# Altium PCB Studio_Clock_hv1.01_PCB_240215a.PcbDoc (part 4 of 5)
Units mm, origin at the board's own origin, x right, y up, seen from the top; angles counter-clockwise.
Board outline 360 x 60 mm, 4 copper layers (TOP, PWR, GND, BOTTOM), stack 0.547 mm thick; 257 components, 289 nets, 969 pads, 664 vias.
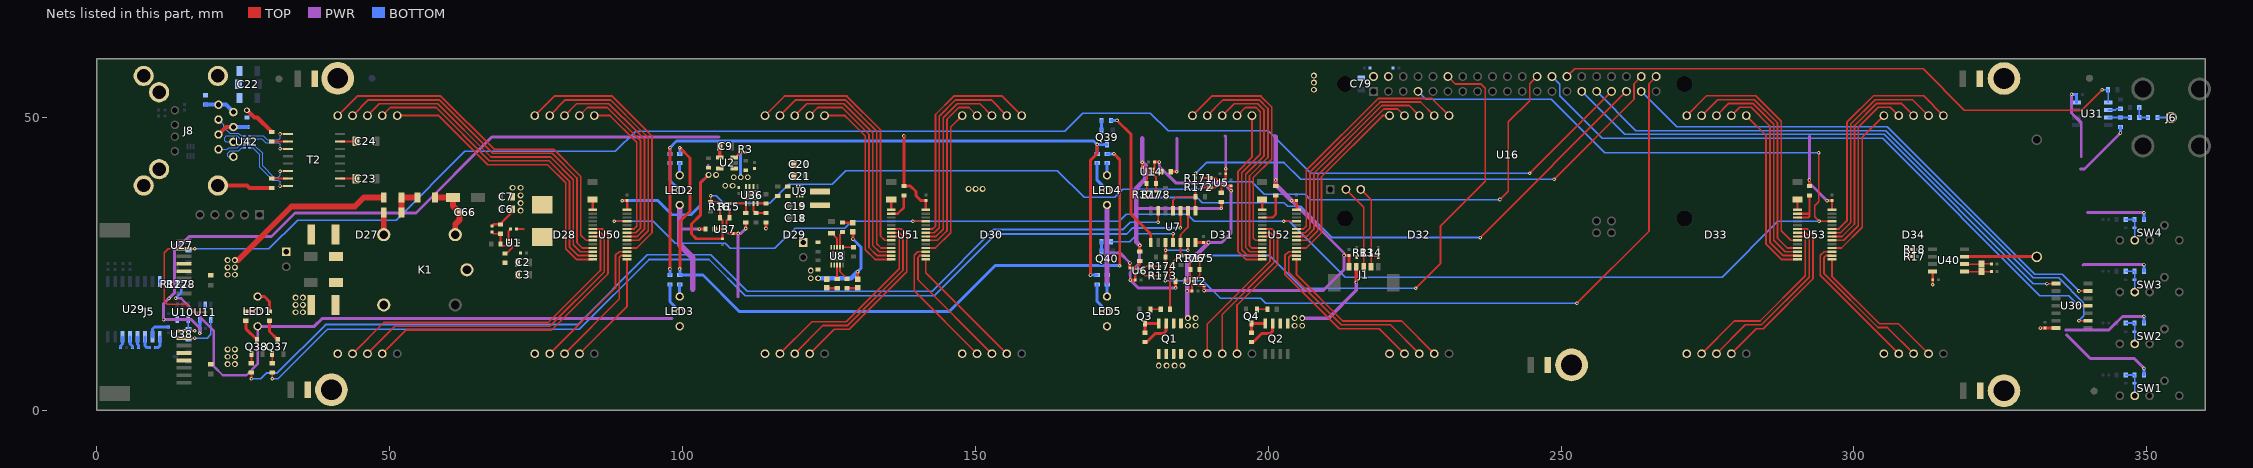
[diagram p4: the nets of this part, all layers, seen from the top]

## Via types
v1: diameter 0.6, hole 0.3, TOP to BOTTOM, 539 vias
v2: diameter 1, hole 0.6, TOP to BOTTOM, 125 vias

## Nets (pads, with @x,y where several pads share a name; then routed paths per layer and width w, separated by ;. In a path a pad name is that pad's centre, name@x,y a point inside that pad or via, vN(x,y) a via of type N, cw(c..) or ccw(c..) an arc to the next point about the centre after c; other vN are vias at no path point) (continued)
NetD34_2: D34.2 U53.15 | length 24.8
  TOP w0.3: U53.15@296.238,25.775 296.238,22.912 304.35,14.8 307.605,14.8 D34.2@312.725,9.68
NetD34_3: D34.3 U53.16 | length 25.2
  TOP w0.3: U53.16@296.238,26.425 295.175,26.425 294.9,26.15 294.9,23.344 304.094,14.15 305.715,14.15 D34.3@310.185,9.68
NetD34_4: D34.4 U53.17 | length 24.6
  TOP w0.3: U53.17@296.238,27.075 294.875,27.075 294.25,26.45 294.25,23.075 D34.4@307.645,9.68
NetD34_6: D34.6 U53.18 | length 27.2
  TOP w0.3: U53.18@296.238,27.725 297.875,27.725 301.4,31.25 301.4,46.615 D34.6@305.105,50.32
NetD34_7: D34.7 U53.20 | length 31.3
  TOP w0.3: U53.20@296.238,29.025 298.233,29.025 300.75,31.542 300.75,48.35 304.15,51.75 306.215,51.75 D34.7@307.645,50.32
NetD34_8: D34.8 U53.21 | length 34.1
  TOP w0.3: U53.21@296.238,29.675 297.963,29.675 300.1,31.812 300.1,48.619 303.881,52.4 308.105,52.4 D34.8@310.185,50.32
NetD34_9: D34.9 U53.22 | length 36.9
  TOP w0.3: U53.22@296.238,30.325 297.694,30.325 299.45,32.081 299.45,48.888 303.612,53.05 309.995,53.05 D34.9@312.725,50.32
NetD34_10: D34.10 U53.23 | length 39.7
  TOP w0.3: U53.23@296.238,30.975 297.425,30.975 298.8,32.35 298.8,49.158 303.342,53.7 311.885,53.7 D34.10@315.265,50.32
NetF2_2: 
NetF3_1: F3.1 J2.1
NetJ5_9: J5.9 U10.4 U38.1 | length 4.6
  TOP w0.25: J5.9@14.9,13.61 v1(16.75,13.61)
  BOTTOM w0.25: U10.4@15.65,15.5 U38.1@15.65,13.95 15.95,13.95 16.29,13.61 v1(16.75,13.61)
NetJ5_10: J5.10 U11.4 U38.2 | length 8.6
  TOP w0.25: J5.10@14.9,12.34 v1(16.75,12.34)
  BOTTOM w0.25: U38.2@15.65,12.05 16,12.05 16.29,12.34 ; 16.3,12.34 v1(16.75,12.34) 18.84,12.34 19.5,13 U11.4@19.5,15.5
NetJ6_1: J6.1 R5.2 | length 2.4
  BOTTOM w0.3: R5.2@351.8,50 J6.1@354.158,50
NetJ8_1: J8.1 U42.1 | length 4.8
  BOTTOM w0.2: J8.1@23.33,43.295 22.48,43.295 22.353,43.422 22.353,43.888 22.764,44.3 24.207,44.3 24.757,44.85 U42.1@25.233,44.85
NetJ8_2: J8.2 U42.2 | length 4.8
  BOTTOM w0.2: J8.2@20.79,44.565 22.322,44.565 22.557,44.8 24,44.8 24.55,45.35 U42.2@25.233,45.35
NetJ8_3: J8.3 U42.4 | length 5.8
  BOTTOM w0.2: J8.3@23.33,45.835 22.015,45.835 21.825,46.025 21.825,46.525 22.15,46.85 23.993,46.85 24.493,46.35 U42.4@25.233,46.35
NetJ8_4: J8.4 J8.5 R11.2 | length 5.4
  TOP w0.7: J8.4@20.79,47.105 22.06,48.375 J8.5@23.33,48.375
  BOTTOM w0.7: J8.5@23.33,48.375 23.355,48.4 R11.2@25.65,48.4
NetJ8_6: J8.6 U42.5 | length 5.8
  BOTTOM w0.2: J8.6@20.79,49.645 21.7,48.735 21.7,48.325 22.675,47.35 24.2,47.35 24.7,46.85 U42.5@25.233,46.85
NetJ8_7: J8.7 J8.8 R12.2 | length 5.3
  BOTTOM w0.7: R12.2@18.55,52.2 22.045,52.2 J8.7@23.33,50.915
NetL2_1: L2.1 U9.5
NetLED1_1: LED1.1 R19.1 | length 4.1
  TOP w0.5: LED1.1@27.461,19.431 28.619,19.431 29.5,18.55 R19.1@29.5,16.9
NetLED1_3: LED1.3 R20.1 | length 2
  TOP w0.5: R20.1@25.45,16.9 25.459,16.891 LED1.3@27.461,16.891
NetLED2_1: LED2.1 R179.1 | length 2.1
  BOTTOM w0.5: LED2.1@99.521,40.132 99.521,42.172 R179.1@99.55,42.2
NetLED2_3: LED2.3 R180.1 | length 5.3
  BOTTOM w0.5: R180.1@97.85,42.2 97.85,39.263 LED2.3@99.521,37.592
NetLED3_1: LED3.1 R181.1 | length 2.1
  BOTTOM w0.5: LED3.1@99.521,19.431 99.521,21.472 R181.1@99.55,21.5
NetLED3_3: LED3.3 R182.1 | length 5.3
  BOTTOM w0.5: R182.1@97.85,21.5 97.85,18.562 LED3.3@99.521,16.891
NetLED4_1: LED4.1 R183.1 | length 2.1
  BOTTOM w0.5: LED4.1@172.481,40.132 172.481,42.182 R183.1@172.5,42.2
NetLED4_3: LED4.3 R184.1 | length 5.3
  BOTTOM w0.5: R184.1@170.8,42.2 170.8,39.274 LED4.3@172.481,37.592
NetLED5_1: LED5.1 R185.1 | length 2.1
  BOTTOM w0.5: LED5.1@172.481,19.431 172.481,21.482 R185.1@172.5,21.5
NetLED5_3: LED5.3 R186.1 | length 5.3
  BOTTOM w0.5: R186.1@170.8,21.5 170.8,18.573 LED5.3@172.481,16.891
NetLED6_2: LED6.2 R58.2 | length 1.8
  TOP w0.4: R58.2@127.3,32.05 129.05,32.05 LED6.2@129.1,32
NetLED7_2: LED7.2 R57.2 | length 1.8
  TOP w0.4: R57.2@128.1,20.85 129.85,20.85 LED7.2@129.9,20.9
NetLED8_2: LED8.2 R56.2 | length 1.8
  TOP w0.4: LED8.2@124.6,20.9 124.65,20.85 R56.2@126.4,20.85
NetLED17_2: 
NetLED18_2: 
NetLED19_2: 
NetQ1_4: Q1.4 Q3.3 R38.1 | length 3.9
  TOP w0.5: R38.1@178.95,13.25 Q3.3@178.95,14.85 181.29,14.85 Q1.4@181.295,14.855
NetQ2_4: Q2.4 Q4.3 R39.1 | length 3.9
  TOP w0.5: R39.1@197.15,13.25 Q4.3@197.15,14.85 199.49,14.85 Q2.4@199.495,14.855
NetQ3_1: Q3.1 R40.1 | length 1.8
  TOP w0.3: Q3.1@179.9,17.25 R40.1@181.65,17.25
NetQ4_1: Q4.1 R41.1 | length 1.8
  TOP w0.3: Q4.1@198.1,17.25 R41.1@199.85,17.25
NetQ37_1: Q37.1 R46.2 | length 1.6
  TOP w0.3: R46.2@29.95,8.05 Q37.1@29.95,9.65
NetQ37_3: Q37.3 R19.2 | length 3.8
  TOP w0.5: R19.2@29.5,15.3 29.5,13.45 Q37.3@30.9,12.05
NetQ38_1: Q38.1 R47.1 | length 1.6
  TOP w0.3: R47.1@26.4,8.05 Q38.1@26.4,9.65
NetQ38_3: Q38.3 R20.2 | length 4
  TOP w0.5: R20.2@25.45,15.3 25.45,13.95 Q38.3@27.35,12.05
NetQ39_1: Q39.1 R53.2 | length 1.7
  BOTTOM w0.5: Q39.1@171.55,47.8 R53.2@171.55,49.5
NetQ39_3: Q39.3 R180.2 R182.2 R184.2 R186.2 | length 123.7
  TOP w0.5: v1(97.85,24.15) v1(97.85,44.85) ; v1(169.65,23.1) 169.65,42.7 170.8,43.85 v1(170.8,45.4)
  BOTTOM w0.5: R182.2@97.85,23.1 v1(97.85,24.15) ; R180.2@97.85,43.8 v1(97.85,44.85) 99,46 170.2,46 v1(170.8,45.4) ; v1(169.65,23.1) R186.2@170.8,23.1 ; R184.2@170.8,43.8 v1(170.8,45.4) ; Q39.3@172.5,45.4 v1(170.8,45.4)
NetQ40_1: Q40.1 R55.2 | length 1.7
  BOTTOM w0.5: Q40.1@171.55,27.1 R55.2@171.55,28.8
NetQ40_3: Q40.3 R179.2 R181.2 R183.2 R185.2 | length 127.5
  TOP w0.5: v1(99.55,24.15) 99.55,32.25 101.3,34 101.3,43.1 v1(99.55,44.85) ; v1(173.65,43.8) 174.65,42.8 v1(174.65,24.7)
  BOTTOM w0.5: v1(99.55,24.15) R181.2@99.55,23.1 103.5,23.1 109.75,16.85 145.5,16.85 153.35,24.7 Q40.3@172.5,24.7 ; R179.2@99.55,43.8 v1(99.55,44.85) ; R185.2@172.5,23.1 Q40.3@172.5,24.7 ; R183.2@172.5,43.8 v1(173.65,43.8) ; v1(174.65,24.7) Q40.3@172.5,24.7
NetR4_1: R4.1 R5.1 R6.2 | length 3.2
  BOTTOM w0.3: R6.2@348.7,51.7 R4.1@348.7,50 R5.1@350.2,50
NetR4_2: R4.2 R200.2 U31.3 | length 3.7
  BOTTOM w0.3: U31.3@343.4,50.015 347.085,50.015 R4.2@347.1,50
NetR9_2: R9.2 T2.15 | length 2.8
  TOP w0.35: R9.2@29.9,39.55 29.925,39.575 T2.15@32.642,39.575
NetR10_2: R10.2 T2.10 | length 2.8
  TOP w0.35: R10.2@29.9,45.9 29.925,45.925 T2.10@32.642,45.925
NetR15_1: R15.1 R159.2 U37.3 | length 3
  TOP w0.35: U37.3@107.537,31.45 107.537,32.437 R159.2@108,32.9 R15.1@108,34.3
NetR16_2: R16.2 R159.1 U37.4 | length 3
  TOP w0.35: R16.2@106.4,34.3 R159.1@106.4,32.9 106.863,32.437 U37.4@106.863,31.45
NetR21_2: R21.2 U53.1 | length 1.8
  TOP w0.4: R21.2@290.35,36 290.362,35.988 U53.1@290.362,34.225
NetR42_1: R42.1 R172.2 U5.4 | length 3.1
  TOP w0.3: R172.2@188.6,38.05 191.037,38.05 U5.4@191.5,38.513
NetR42_2: R42.2 R171.1 U5.3 | length 3.1
  TOP w0.3: R171.1@188.6,39.65 R42.2@190,39.65 191.037,39.65 U5.3@191.5,39.187
NetR43_1: R43.1 U5.5 | length 1.4
  TOP w0.35: R43.1@192,37.15 U5.5@192,38.513
NetR45_2: R45.2 R172.1 U7.1 U7.4 | length 9.9
  TOP w0.3: U7.4@183.75,34.075 183.75,35.85 184.35,36.45 R45.2@187.6,36.45 ; U7.1@187.56,34.075 187.56,36.41 R45.2@187.6,36.45 ; R45.2@187.57,36.42 R45.2@187.6,36.45 ; R172.1@187.6,38.05 R45.2@187.6,36.45
NetR46_1: R46.1 U7.3 | length 174.8
  TOP w0.3: v1(29.95,5.4) R46.1@29.95,6.45 ; v1(185,31.15) 185.02,31.17 U7.3@185.02,34.075
  BOTTOM w0.3: v1(29.95,5.4) 30.95,5.4 39.4,13.85 82.4,13.85 94.3,25.75 104.519,25.75 110.719,19.55 142.95,19.55 153.5,30.1 175.8,30.1 176.85,31.15 v1(185,31.15)
NetR47_2: R47.2 U7.6 | length 174
  TOP w0.3: v1(26.4,5.4) R47.2@26.4,6.45 ; v1(181.2,32.1) 181.21,32.11 U7.6@181.21,34.075
  BOTTOM w0.3: v1(26.4,5.4) 28,5.4 29,6.4 30.819,6.4 39.069,14.65 82.069,14.65 93.969,26.55 104.85,26.55 111.05,20.35 142.619,20.35 153.169,30.9 175.25,30.9 176.45,32.1 v1(181.2,32.1)
NetR48_1: R48.1 R174.2 U6.4 | length 3.1
  TOP w0.3: U6.4@178.55,24.137 179.013,24.6 R174.2@181.45,24.6
NetR48_2: R48.2 R173.1 U6.3 | length 3.1
  TOP w0.3: U6.3@178.55,23.463 179.013,23 R48.2@180.05,23 R173.1@181.45,23
NetR49_1: R49.1 U6.5 | length 1.4
  TOP w0.35: U6.5@178.05,24.137 R49.1@178.05,25.5
NetR51_2: R51.2 R174.1 U7.10 U7.13 | length 9.1
  TOP w0.3: R174.1@182.45,24.6 R51.2@182.45,26.2 ; U7.10@182.48,28.525 R51.2@182.48,26.23 ; U7.13@186.29,28.625 186.29,27.36 v1(186.3,27.35) ; R51.2@182.45,26.2 R51.2@182.48,26.23 ; R51.2@182.45,26.2 R51.2@182.48,26.23
  BOTTOM w0.3: v1(182.475,27.35) v1(186.3,27.35)
NetR53_1: R53.1 U7.8 | length 24.3
  TOP w0.5: v1(174.2,49.5) 176.6,47.1 176.6,33.45 179.94,30.11 U7.8@179.94,28.625
  BOTTOM w0.5: R53.1@173.15,49.5 v1(174.2,49.5)
NetR55_1: R55.1 U7.11 | length 12.7
  TOP w0.3: U7.11@183.75,28.625 v1(183.75,30.15)
  BOTTOM w0.3: R55.1@173.15,28.8 176.35,28.8 177.7,30.15 v1(183.75,30.15)
NetR56_1: R56.1 U8.3 | length 2.4
  TOP w0.3: R56.1@126.4,22.45 U8.3@126.4,24.85
NetR57_1: R57.1 U8.4 | length 2.9
  TOP w0.3: U8.4@126.9,24.85 126.9,23.65 R57.1@128.1,22.45
NetR58_1: R58.1 U8.7 | length 2.8
  TOP w0.3: U8.7@126.9,27.85 126.9,30.05 R58.1@127.3,30.45
NetR59_2: R59.2 R63.1 U9.1
NetR61_1: R61.1 U8.6 | length 1.8
  TOP w0.3: U8.6@127.4,27.85 R61.1@129.2,27.85
NetR62_2: R62.2 U8.8 | length 2.8
  TOP w0.3: R62.2@125.45,30.25 126.4,29.3 U8.8@126.4,27.85
NetR67_1: R67.1 R176.2 U12.4 | length 3.1
  TOP w0.3: R176.2@186.7,25.45 186.7,23.013 U12.4@187.163,22.55
NetR67_2: R67.2 R175.1 U12.3 | length 3.1
  TOP w0.3: U12.3@187.837,22.55 188.3,23.013 R67.2@188.3,24.05 R175.1@188.3,25.45
NetR69_1: R69.1 U12.5 | length 1.4
  TOP w0.35: R69.1@185.8,22.05 U12.5@187.163,22.05
NetR74_1: R74.1 R178.2 U14.4 | length 3.1
  TOP w0.3: U14.4@180.387,40.25 180.85,39.787 R178.2@180.85,37.35
NetR74_2: R74.2 R177.1 U14.3 | length 3.1
  TOP w0.3: R177.1@179.25,37.35 R74.2@179.25,38.75 179.25,39.787 U14.3@179.713,40.25
NetR75_1: R75.1 U14.5 | length 1.4
  TOP w0.35: U14.5@180.387,40.75 R75.1@181.75,40.75
NetR92_2: R92.2 SS1.1
NetR93_2: R93.2 SS2.1
NetR94_2: R94.2 SS3.1
NetR95_2: R95.2 SS4.1
NetR96_2: R96.2 SS5.1
NetR124_1: R124.1 R125.1 R126.1 | length 5.3
  TOP w1: R125.1@52,33.8 R124.1@52,36.35 R126.1@54.75,36.35
NetR156_1: R156.1 U36.4 | length 1.5
  TOP w0.35: U36.4@112.775,35.3 R156.1@114.25,35.3
NetR157_1: R157.1 R1588.2 U36.3 | length 3.5
  TOP w0.35: U36.3@112.125,35.3 112.125,34.125 R157.1@112.55,33.7 R1588.2@114.25,33.7
NetR160_1: R160.1 U37.5 | length 1.4
  TOP w0.35: R160.1@105.5,30.95 U37.5@106.863,30.95
NetR162_2: R162.2 U1.5 | length 3
  TOP w0.3: R162.2@69.7,26.8 70,26.8 70.95,27.75 70.95,28.45 70.8,28.6 U1.5@70.312,28.6
NetR187_2: R187.2 U50.1 | length 2
  TOP w0.4: R187.2@84.65,36.2 R187.2@84.662,36.188 ; U50.1@84.662,34.225 R187.2@84.662,36.238
NetR188_1: R188.1 U52.3 | length 5.8
  TOP w0.4: U52.3@198.962,32.925 200.775,32.925 201.3,33.45 R188.1@201.3,36.7
NetR189_2: R189.2 U52.1 | length 1.8
  TOP w0.4: R189.2@198.95,36 198.962,35.988 U52.1@198.962,34.225
NetR190_1: R190.1 U51.2 | length 4.6
  TOP w0.4: U51.2@135.662,33.575 136.725,33.575 137.8,34.65 R190.1@137.8,36.7
NetR191_2: R191.2 U51.1 | length 1.8
  TOP w0.4: R191.2@135.65,36 135.662,35.988 U51.1@135.662,34.225
NetR192_1: R192.1 U53.2 U53.3 | length 7.7
  TOP w0.4: U53.3@290.362,32.925 292.175,32.925 292.4,33.15 292.4,33.575 ; U53.2@290.362,33.575 292.4,33.575 ; R192.1@292.4,36.7 292.4,33.575
NetR199_2: R199.2 U31.2 | length 2.2
  BOTTOM w0.3: U31.2@343.4,51.285 344.635,51.285 344.85,51.5 R199.2@345.5,51.5
NetT1_6: 
OPTO_A: 
OPTO_B: 
PD_CLS1: 
PD_CLS2: 
PD_CTRL: 
PD_DET: 
PD_FAUX: 
PD_GD_DNP: 
PD_PGD: 
PD_RAUX: 
PD_STBY: 
PD_T0: 
PD_T1: 
PD_T2: 
PD_VB: 
PD_VOUT: 
PDN_RTN: 
PGND: C22.1 J8.13 J8.14 J8.15 J8.16 J8.17 J8.18 R7.1 R8.1 R9.1 R10.1 R11.1 R12.1 | length 15.2
  TOP w0.7: J8.13@20.69,38.39 25.635,38.39 26.05,37.975 R9.1@29.9,37.975 ; v2(25.65,51.25) 26.9,50 27.4,50 R10.1@29.9,47.5
PI_DBG_RXD: R13.2 U16.42 | length 11.5
  TOP w0.25: U16.42@213.26,37.73 216.3,34.69 R13.2@216.3,27.45
PI_DBG_TXD: R14.2 U16.43 | length 11
  TOP w0.25: U16.43@215.8,37.73 217.55,35.98 R14.2@217.55,27.45
PSU_RTN_DNP: 
PSU_VIN_DNP: 
PWM_CTRL_GREEN: R175.2 U16.12 | length 85.5
  TOP w0.3: R175.2@188.3,26.45 v1(189.15,26.45) ; v1(225.2,20.85) 229.4,25.05 229.4,31.45 237.05,39.1 237.05,55 236.35,55.7 231.97,55.7 U16.12@230.67,57
  BOTTOM w0.3: v1(189.15,26.45) 200.2,26.45 205.8,20.85 v1(225.2,20.85)
PWM_CTRL_RED: R177.2 U16.35 | length 96.8
  TOP w0.3: v1(178.4,36.35) R177.2@179.25,36.35 ; v1(236.19,29.5) U16.35@261.15,54.46
  BOTTOM w0.3: v1(178.4,36.35) 187.85,36.35 188.75,35.45 202.7,35.45 203.3,34.85 205.55,34.85 210.9,29.5 v1(236.19,29.5)
PWM_GREEN: R40.2 R71.2 R176.1 U7.2 U7.12 | length 19.7
  TOP w0.3: R40.2@183.25,17.25 183.25,24.85 R71.2@184.87,26.47 ; R71.2@184.97,26.47 185.12,26.47 R71.2@185.1,26.45 R176.1@186.7,26.45 ; R71.2@185.02,26.47 U7.12@185.02,28.525 ; U7.12@185.02,28.625 185.02,29.97 186.29,31.24 U7.2@186.29,34.075